# Altium PCB PCB2.PcbDoc
Units mil, origin at the board's own origin, x right, y up, seen from the top; angles counter-clockwise.
Board outline 6000 x 4000 mil, 2 copper layers (Top Layer, Bottom Layer); 1 components, 0 nets, 105 pads, 0 vias.
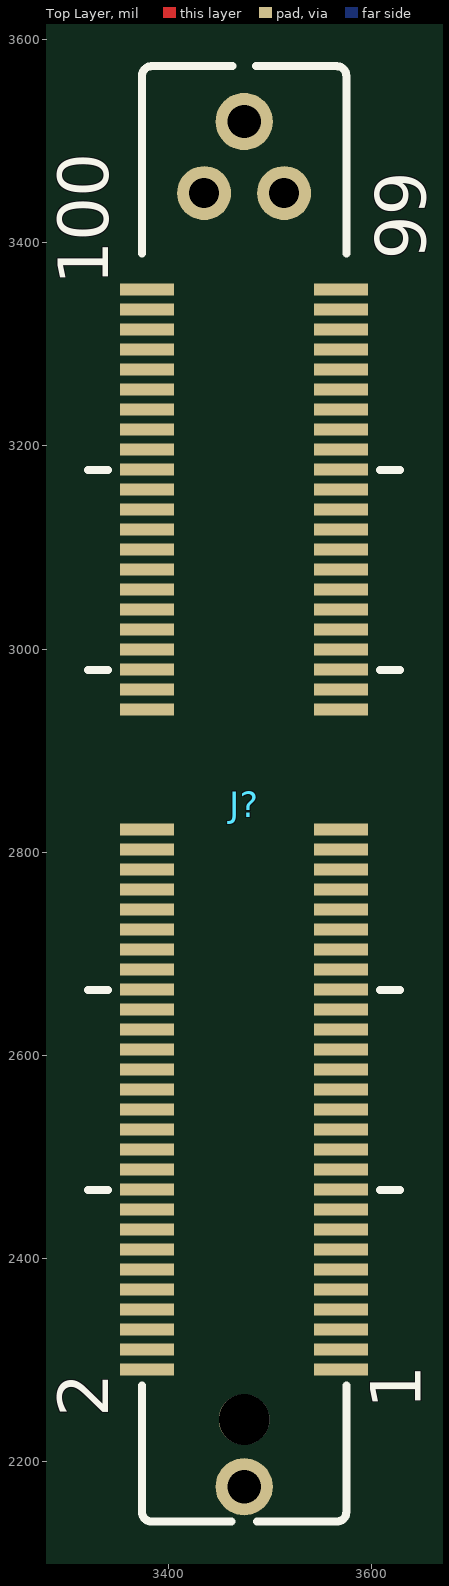
[diagram p0: Top Layer view]
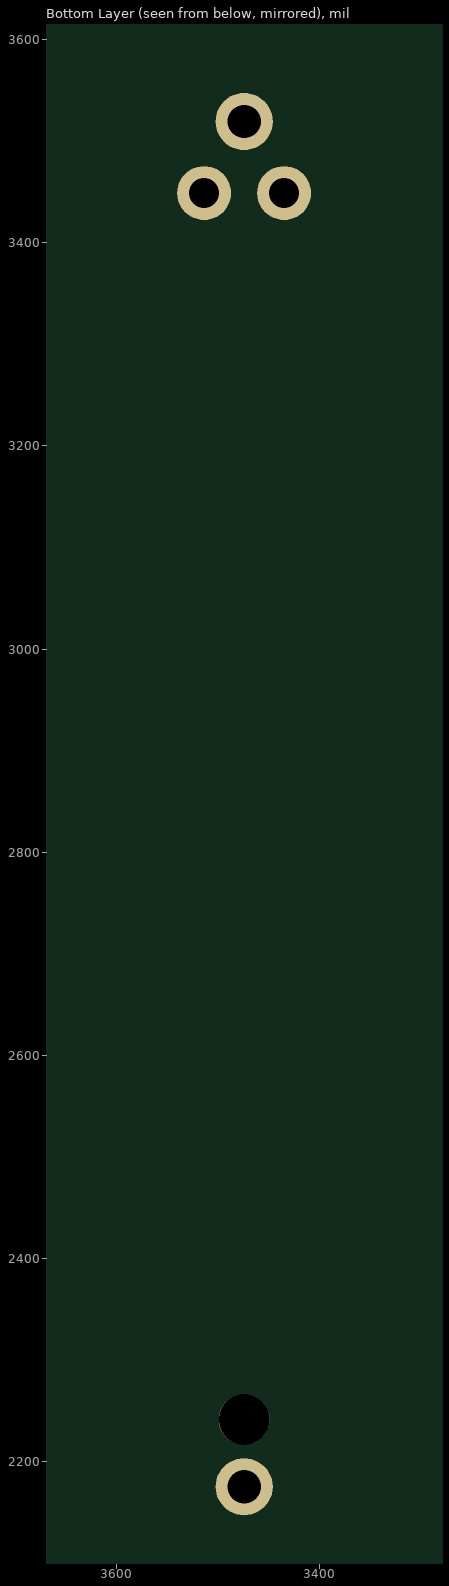
[diagram p1: Bottom Layer view, seen from below]

## Layer stack, top to bottom
Top Solder: solder mask 0.4, Solder Resist, Dk 3.5
Top Layer: signal copper 1.4
Dielectric 1: dielectric 12.6, FR-4, Dk 4.8
Bottom Layer: signal copper 1.4
Bottom Solder: solder mask 0.4, Solder Resist, Dk 3.5

## Board outline
1000,1000 7000,1000 7000,5000 1000,5000

## Design rules (kind name [scope] priority, off if disabled: settings)
Clearance [All] p1: gap=10 ignorepadtopadclearanceinfootprint=FALSE
PolygonConnect [All] p1: connectstyle=Relief reliefconductorwidth=10 reliefentries=4 polygonreliefangle="90 Angle" airgapwidth=10
RoutingVias [All] p1: holewidth=28 width=50 viastyle="Through Hole" minholewidth=28 minwidth=50 maxholewidth=28 maxwidth=50
SolderMaskExpansion [All] p1: expansion=4 istentingtop=FALSE
Width [All] p1: maxlimit=10 minlimit=10 preferedwidth=10
30 further rules are at their usual default settings.

## Components (designator, comment, footprint, x,y, rotation, side; value= is the part's Value field where it differs from the comment)
J? "MEC5-050-01-L-DV-W1-K-TR" MEC5-050-01-L-DV-W1-K-TR 3474.53,2822.48 r90 top

## Footprints (in the part's own frame and the unit in brackets; to place one, negate y for a bottom-side part, rotate by r counter-clockwise, add the part's x,y. Pads: shape width x height; smd on the part's side, far side on the other; paste and mask are expansions set on the pad)
MEC5-050-01-L-DV-W1-K-TR [mm]
  rect 0.3x1.35 smd mask+0: 1(-13.5,-2.425) 2(-13.5,2.425) 3(-13,-2.425) 4(-13,2.425) 5(-12.5,-2.425) 6(-12.5,2.425) 7(-12,-2.425) 8(-12,2.425) 9(-11.5,-2.425) 10(-11.5,2.425) 11(-11,-2.425) 12(-11,2.425) 13(-10.5,-2.425) 14(-10.5,2.425) 15(-10,-2.425) 16(-10,2.425) 17(-9.5,-2.425) 18(-9.5,2.425) 19(-9,-2.425) 20(-9,2.425) 21(-8.5,-2.425) 22(-8.5,2.425) 23(-8,-2.425) 24(-8,2.425) 25(-7.5,-2.425) 26(-7.5,2.425) 27(-7,-2.425) 28(-7,2.425) 29(-6.5,-2.425) 30(-6.5,2.425) 31(-6,-2.425) 32(-6,2.425) 33(-5.5,-2.425) 34(-5.5,2.425) 35(-5,-2.425) 36(-5,2.425) 37(-4.5,-2.425) 38(-4.5,2.425) 39(-4,-2.425) 40(-4,2.425) 41(-3.5,-2.425) 42(-3.5,2.425) 43(-3,-2.425) 44(-3,2.425) 45(-2.5,-2.425) 46(-2.5,2.425) 47(-2,-2.425) 48(-2,2.425) 49(-1.5,-2.425) 50(-1.5,2.425) 51(-1,-2.425) 52(-1,2.425) 53(-0.5,-2.425) 54(-0.5,2.425) 55(0,-2.425) 56(0,2.425) 57(3,-2.425) 58(3,2.425) 59(3.5,-2.425) 60(3.5,2.425) 61(4,-2.425) 62(4,2.425) 63(4.5,-2.425) 64(4.5,2.425) 65(5,-2.425) 66(5,2.425) 67(5.5,-2.425) 68(5.5,2.425) 69(6,-2.425) 70(6,2.425) 71(6.5,-2.425) 72(6.5,2.425) 73(7,-2.425) 74(7,2.425) 75(7.5,-2.425) 76(7.5,2.425) 77(8,-2.425) 78(8,2.425) 79(8.5,-2.425) 80(8.5,2.425) 81(9,-2.425) 82(9,2.425) 83(9.5,-2.425) 84(9.5,2.425) 85(10,-2.425) 86(10,2.425) 87(10.5,-2.425) 88(10.5,2.425) 89(11,-2.425) 90(11,2.425) 91(11.5,-2.425) 92(11.5,2.425) 93(12,-2.425) 94(12,2.425) 95(12.5,-2.425) 96(12.5,2.425) 97(13,-2.425) 98(13,2.425) 99(13.5,-2.425) 100(13.5,2.425)
  round 1.43 hole 0.83 mask+0: G1(-16.43,0) G4(17.7,0)
  round 1.35 hole 0.75 mask+0: G2(15.91,1) G3(15.91,-1)
  round 1.27 hole 1.27 unplated: ""(-14.75,0)
  silkscreen extent -17.3,-3.9 19.08,3.9

## Part data
J?: package=None, Availability=Unavailable, MF=Samtec, MP=MEC5-050-01-L-DV-W1-K-TR, Price=None

## Nets (pads, with @x,y where several pads share a name; then routed paths per layer and width w, separated by ;. In a path a pad name is that pad's centre, name@x,y a point inside that pad or via, vN(x,y) a via of type N, cw(c..) or ccw(c..) an arc to the next point about the centre after c; other vN are vias at no path point)
pads on no net: J?. J?.1 J?.2 J?.3 J?.4 J?.5 J?.6 J?.7 J?.8 J?.9 J?.10 J?.11 J?.12 J?.13 J?.14 J?.15 J?.16 J?.17 J?.18 J?.19 J?.20 J?.21 J?.22 J?.23 J?.24 J?.25 J?.26 J?.27 J?.28 J?.29 J?.30 J?.31 J?.32 J?.33 J?.34 J?.35 J?.36 J?.37 J?.38 J?.39 J?.40 J?.41 J?.42 J?.43 J?.44 J?.45 J?.46 J?.47 J?.48 J?.49 J?.50 J?.51 J?.52 J?.53 J?.54 J?.55 J?.56 J?.57 J?.58 J?.59 J?.60 J?.61 J?.62 J?.63 J?.64 J?.65 J?.66 J?.67 J?.68 J?.69 J?.70 J?.71 J?.72 J?.73 J?.74 J?.75 J?.76 J?.77 J?.78 J?.79 J?.80 J?.81 J?.82 J?.83 J?.84 J?.85 J?.86 J?.87 J?.88 J?.89 J?.90 J?.91 J?.92 J?.93 J?.94 J?.95 J?.96 J?.97 J?.98 J?.99 J?.100 J?.G1 J?.G2 J?.G3 J?.G4

## Text inside footprints (layer, text, board x,y; h text height)
J?: Mechanical 13 "2.300" at 3630.71,2038.07 h10 r90; Mechanical 13 "4.600" at 3513.11,2101.81 h10 r90; Mechanical 13 "4.850" at 3492.95,2033.78 h10 r90; Mechanical 13 "1.680" at 3328.35,2045.63 h10 r90; Mechanical 13 "1" at 3647.56,2252.09 h50 r90; Mechanical 13 "2" at 3341.93,2242.68 h50 r90; Mechanical 13 "1.250" at 3656.5,2357.91 h10 r90; Mechanical 13 "0.500" at 3335.43,2356.73 h10 r90; Mechanical 13 "13.500" at 3677.95,2504.02 h10 r90; Mechanical 13 "22.000" at 3304.53,2656.77 h10 r90; Mechanical 13 "27.000" at 3707.87,2790.43 h10 r90; Mechanical 13 "35.380" at 3209.06,2790.43 h10 r90; Mechanical 13 "34.130" at 3244.88,2790.43 h10 r90; Mechanical 13 "30.660" at 3280.71,2791.61 h10 r90; Mechanical 13 "3.000" at 3324.8,2986.85 h10 r90; Mechanical 13 "99" at 3654.57,3381.65 h50 r90; Mechanical 13 "100" at 3341.81,3359.02 h50 r90; Mechanical 13 "2.420" at 3598.03,3606.34 h10 r90; Mechanical 13 "2.000" at 3399.53,3613.5 h10 r90; Top Overlay "1" at 3648.19,2251.65 h50 r90; Top Overlay "2" at 3340.79,2244.09 h50 r90; Top Overlay "99" at 3653.23,3383.23 h50 r90; Top Overlay "100" at 3340.79,3358.23 h50 r90